# Altium PCB Driver_BLDC.PcbDoc (part 3 of 4)
Units mm, origin at the board's own origin, x right, y up, seen from the top; angles counter-clockwise.
Board outline 320 x 180.01 mm, 2 copper layers (Top Layer, Bottom Layer), stack 1.371 mm thick; 421 components, 171 nets, 1112 pads, 449 vias.
Unrouted connection lines stored in the file: 1.
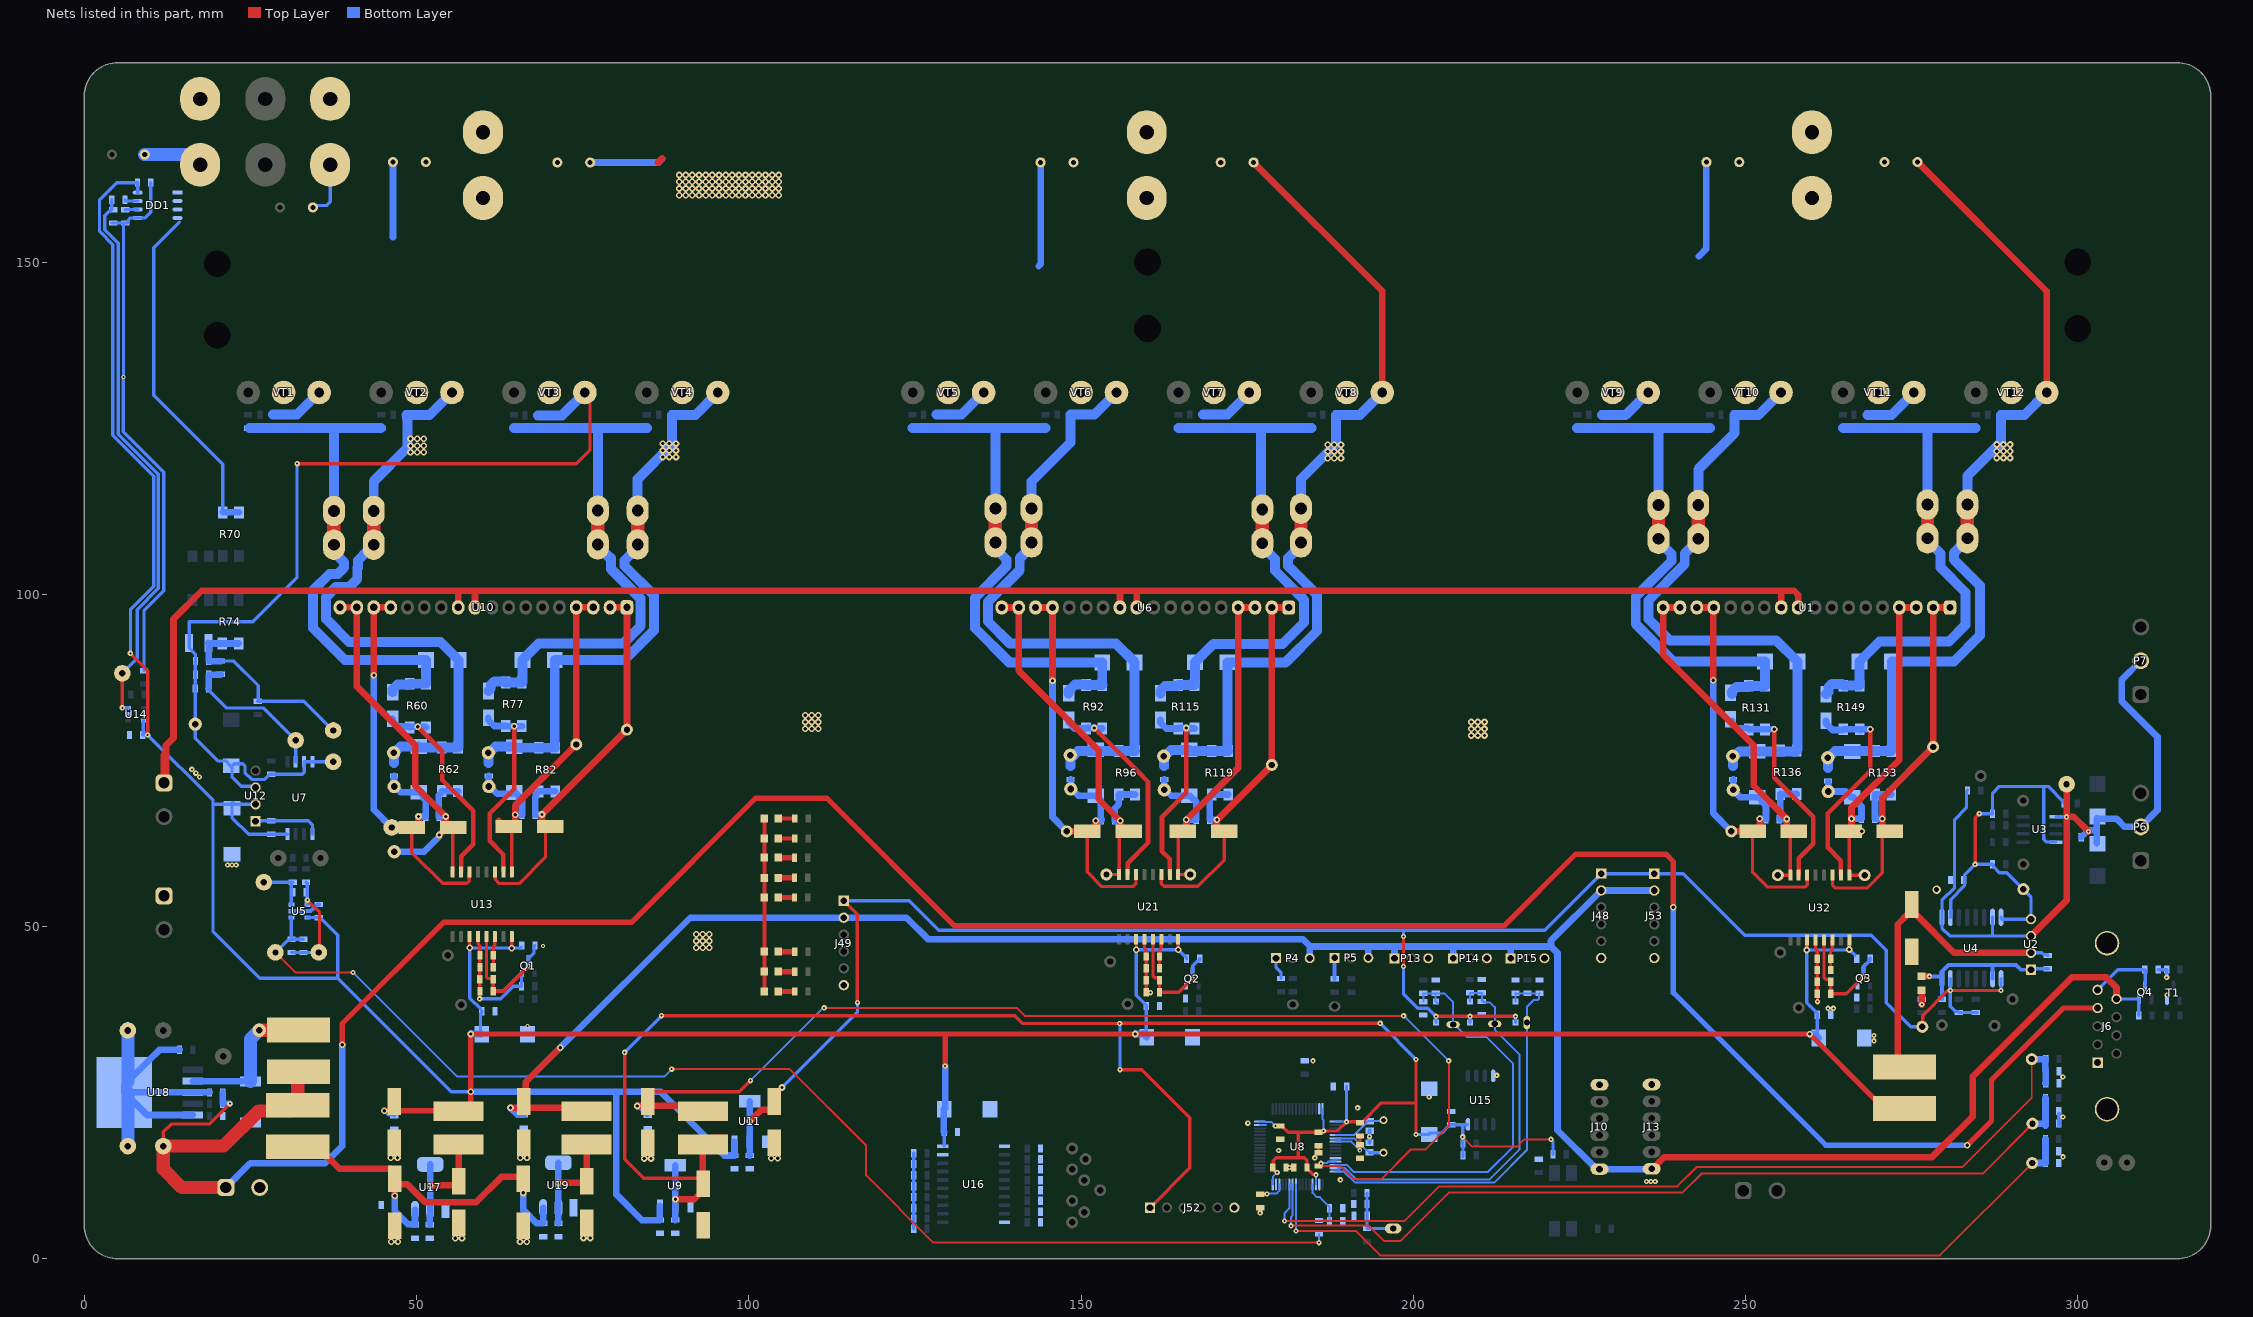
[diagram p2: the nets of this part, all layers, seen from the top]

## Via types
v1: diameter 1, hole 0.5, Top Layer to Bottom Layer, 222 vias
v2: diameter 0.8, hole 0.3, Top Layer to Bottom Layer, 162 vias
v3: diameter 0.8, hole 0.3, Top Layer to Bottom Layer, tented both sides, 29 vias
v4: diameter 1, hole 0.5, Top Layer to Bottom Layer, tented both sides, 21 vias
v5: diameter 1.27, hole 0.711, Top Layer to Bottom Layer, 5 vias
v6: diameter 9, hole 4, Top Layer to Bottom Layer, 4 vias
v7: diameter 0.6, hole 0.3, Top Layer to Bottom Layer, 3 vias
v8: diameter 2, hole 1, Top Layer to Bottom Layer, 1 vias
v9: diameter 0.7, hole 0.3, Top Layer to Bottom Layer, tented both sides, 1 vias
v10: diameter 1, hole 0.54, Top Layer to Bottom Layer, 1 vias

## Nets (pads, with @x,y where several pads share a name; then routed paths per layer and width w, separated by ;. In a path a pad name is that pad's centre, name@x,y a point inside that pad or via, vN(x,y) a via of type N, cw(c..) or ccw(c..) an arc to the next point about the centre after c; other vN are vias at no path point)
+3V3: C35.2 C37.1 D11.1 D13.1 D15.1 J48.1 J49.1 J53.1 R25.2 R28.2 TP6.1 U4.1 U4.7 U11.2 | length 288.1
  Top Layer w0.5: C37.1@103.85,23.85 103.85,24.675 104.944,25.769 v1(104.993,25.769) ; J49.1@114.3,53.87 116.325,51.845 116.325,38.575 v2(116.35,38.55) ; v2(198.525,43.975) 198.525,48.487 v2(198.538,48.5) ; v2(203.407,36.49) v2(208.532,36.49) ; v2(208.532,36.49) v2(215.375,36.49) ; TP6.1@276.033,34.9 276.033,35.441 276.279,35.441 276.662,35.824 276.662,36.607 280.365,40.311 280.768,40.311 v3(280.826,40.368) v3(288.446,40.368)
  Top Layer w1: v1(100.15,20.675) 101.9,22.425 103.35,22.425 103.85,22.925 C37.1@103.85,23.85
  Bottom Layer w0.5: v1(104.993,25.769) 116.35,37.126 v2(116.35,38.55) ; J49.1@114.3,53.87 124.18,53.87 128.589,49.461 198.538,49.461 ; v2(198.525,43.975) 198.525,39.875 200.7,37.7 202.197,37.7 v2(203.407,36.49) D13.1@203.407,35.55 ; v2(198.538,48.5) 198.538,49.461 ; D11.1@208.532,35.55 v2(208.532,36.49) ; D15.1@215.375,35.55 v2(215.375,36.49) ; TP6.1@276.609,34.9 274.849,34.9 271.2,38.549 271.2,46.434 268.934,48.7 249.85,48.7 240.59,57.96 J53.1@236.279,57.96 228.289,57.96 J48.1@228.279,57.97 219.77,49.461 198.538,49.461 ; U4.7@280.826,42.143 v3(280.826,40.368) 280.826,37.986 281.584,37.228 281.945,37.228 R25.2@282.095,37.078 R28.2@284.635,37.078 R28.2@284.86,37.078 ; v3(288.446,40.368) U4.1@288.446,42.143
  Bottom Layer w1: C35.2@100.15,15.55 U11.2@100.15,17.625 v1(100.15,20.675) U11.2@100.15,23.725
+3V3_MCU: C4.2 C5.1 C12.1 C13.1 C14.1 C15.1 C16.1 C43.1 C46.2 J52.1 L6.1 R13.1 R14.1 R58.2 R126.1 U8.1 U8.19 U8.32 U8.48 U8.64 U9.2 U15.8 | length 307
  Top Layer w0.3: C13.1@184.007,13.517 C13.1@184.007,13.742 ; v2(207.425,18.35) 208.9,16.875 215.627,16.875 216.727,17.975 v2(220.725,17.975)
  Top Layer w0.5: v2(81.31,31.079) 81.31,15.015 84.2,12.125 92.375,12.125 93.125,11.375 C43.1@93.125,11.3 ; v2(86.867,36.579) 140.021,36.579 141.2,35.4 v2(155.825,35.4) 155.85,35.425 v2(195.025,35.425) ; L6.1@93.125,17.2 94.375,18.45 L6.1@96.65,18.45 ; v2(155.875,28.45) 159.157,28.45 166.384,21.224 166.384,13.704 J52.1@160.38,7.7 ; C15.1@178.926,13.817 178.926,14.752 179.377,15.203 182.669,15.203 ; C15.1@179.001,13.592 179.001,13.367 179.331,13.037 179.45,13.037 v3(179.507,12.98) ; v3(179.238,19.975) 180.225,19.975 181.179,19.021 182.669,19.021 ; C13.1@184.001,13.781 184.001,14.825 183.623,15.203 182.669,15.203 ; C13.1@184.007,13.517 184.835,12.689 185.294,12.689 v2(185.351,12.631) ; C14.1@186.19,19.171 185.891,19.171 C14.1@185.741,19.021 182.669,19.021 ; v3(186.502,19.238) 188.587,19.238 v3(189.958,20.608) 189.981,20.631 191.314,20.631 191.317,20.629 R58.2@191.982,20.629 ; R58.2@191.982,20.479 192.132,20.629 192.381,20.629 195.198,23.446 200.4,23.446 ; v2(200.4,18.7) 200.4,23.446 ; v2(200.4,30) 200.4,23.446 ; 182.669,15.203 182.669,19.021
  Top Layer w1: v1(88.975,8.96) 91.785,8.96 93.125,10.3 C43.1@93.125,11.3 ; C43.1@93.075,12.975 L6.1@93.075,17.2
  Bottom Layer w0.3: U8.48@176.91,20.631 177.651,20.631 177.665,20.618 178.595,20.618 v3(179.238,19.975) ; U8.32@178.851,11.19 178.851,12.324 v3(179.507,12.98) ; U8.19@185.351,11.19 v2(185.351,12.631) ; U8.64@186.351,22.573 186.351,20.975 186.503,20.823 v3(186.502,19.238) ; U8.1@188.294,20.631 188.297,20.634 189.933,20.634 v3(189.958,20.608)
  Bottom Layer w0.5: v2(81.31,31.079) 81.379,31.148 81.437,31.148 v2(86.867,36.579) ; v2(155.825,35.4) 155.853,35.372 155.853,28.472 v2(155.875,28.45) ; v3(189.958,20.608) C16.1@189.958,25.942 ; v2(195.025,35.425) v2@200.4,30.05 ; v2(200.4,18.7) C5.1@202.4,18.7 ; C5.1@202.4,18.921 204.25,18.921 205.35,20.02 205.35,20.025 205.5,20.175 C4.2@205.725,20.175 207.425,20.175 ; R13.1@207.425,17.4 v2(207.425,18.35) 207.425,20.175 ; R14.1@207.475,15.381 R14.1@207.475,15.574 R13.1@207.475,17.35 ; U15.8@208.17,20.175 207.425,20.175 ; v2(220.725,17.975) 220.75,17.975 221.015,17.71 R126.1@221.015,15.753
  Bottom Layer w1: C46.2@88.925,5.825 U9.2@88.925,14.05
+3V3_REF: C17.2 C44.1 C45.2 L6.2 U8.13 | length 178
  Top Layer w0.3: v2(111.342,37.779) 140.321,37.779 141.55,36.55 198.525,36.55 v2(198.55,36.575) ; C17.2@185.741,13.975 188.975,13.975 190.95,12 195.158,12 199.583,16.425 201.775,16.425 205.35,20 205.35,29.775 v2(205.325,29.8)
  Top Layer w0.5: C44.1@84.775,23 C44.1@84.8,23.025 ; C44.1@84.8,23.675 84.8,24.382 85.55,25.132 98.577,25.132 v2(100.245,26.8)
  Top Layer w1: v1(83.225,23) C44.1@84.775,23 ; C44.1@84.8,23.025 L6.2@93.125,23.025
  Bottom Layer w0.3: v2(100.245,26.8) 111.224,37.779 v2(111.342,37.779) ; v3(186.124,14.375) 186.139,14.39 186.953,14.39 187.195,14.631 U8.13@188.292,14.631 ; v2(198.55,36.575) v2@205.311,29.814
  Bottom Layer w0.5: v1(83.225,23) 84.425,21.8 84.425,21.725 84.575,21.575 C45.2@84.8,21.575
+5: C6.2 C7.1 C19.1 C20.2 C21.1 C22.2 C23.1 C24.2 C25.2 C30.1 C36.2 C38.1 C40.2 C42.2 C51.1 C52.2 C73.2 DD1.8 L3.1 L7.2 R76.1 R104.1 R132.1 U5.5 U7.8 U9.3 U11.3 U12.2 U13.3 U13.8 U14.5 U16.20 U21.3 U21.8 U32.3 U32.8 | length 623.9
  Top Layer w0.4: U13.3@57.981,48.476 57.981,46.811 v4(58.004,46.789) ; U21.3@158.278,48.086 158.286,48.078 158.286,46.525 v4(158.316,46.496) ; v4(259.221,46.479) 259.246,46.505 259.246,47.954 U32.3@259.272,47.979
  Top Layer w0.5: v2(6.925,91.125) 9.548,88.502 v2(9.548,78.817) ; v4(64.329,46.739) 64.331,46.741 U13.8@64.331,48.476 ; v4(164.628,46.525) U21.8@164.628,48.086 ; v4(265.622,46.535) U32.8@265.622,47.979
  Top Layer w0.8: v1(45.15,22.3) 56.225,22.3 56.3,22.225 57.15,22.225 58.15,23.225 v1(58.15,25.139) v1(58.15,33.825) 58.157,33.818 129.55,33.818 ; v2(129.55,29.025) 129.55,33.818 ; L3.1@273.925,22.6 272.55,23.975 269.5,23.975 v1(259.657,33.818) 158.182,33.818 v1(158.175,33.825) 158.168,33.818 129.55,33.818
  Bottom Layer w0.5: v2(6.925,91.125) 6.95,91.15 6.95,97.675 10.45,101.175 10.45,117.75 4.3,123.9 4.3,152.6 2.3,154.6 2.3,159.375 4.872,161.947 7.97,161.947 C73.2@8.002,161.979 8.034,161.947 DD1.8@8.034,160.45 ; C40.2@8.748,78.817 8.873,78.942 8.873,80.925 8.948,81 U14.5@8.998,81 ; C40.2@8.945,78.963 8.945,78.82 8.948,78.817 v2(9.548,78.817) 19.375,68.99 19.375,68.385 ; U12.2@25.775,68.385 22.665,68.385 22.375,68.675 22.225,68.675 C30.1@22.225,68.385 ; U7.8@30.545,63.9 C38.1@28.15,63.9 24.725,63.9 22.225,66.4 C30.1@22.225,68.385 ; U5.5@33.517,51.375 33.534,51.358 35.497,51.358 35.497,51.345 35.668,51.175 35.681,51.175 38.157,48.698 38.157,42.211 ; v1(45.15,22.3) 45.775,21.675 46.511,21.675 C52.2@46.661,21.525 ; v1(58.15,25.139) 55.229,25.139 38.157,42.211 ; C24.2@59.628,37.611 58.004,39.235 v4(58.004,46.789) 58.014,46.778 64.289,46.778 v4(64.329,46.739) 64.36,46.77 65.634,46.77 65.776,46.912 R76.1@65.776,46.931 ; C19.1@59.796,33.818 59.789,33.825 59.628,33.985 59.628,36.86 59.796,37.028 C24.2@59.796,37.253 ; U16.20@129.421,16.967 C6.2@129.421,19.077 ; C21.1@159.813,33.9 159.813,36.673 159.813,38.144 158.316,39.641 v4(158.316,46.496) 158.345,46.525 v4(164.628,46.525) 165.635,45.517 165.712,45.517 165.862,45.367 R104.1@165.862,45.142 ; C23.1@260.812,33.8 C22.2@260.812,36.734 260.812,36.959 259.221,38.551 v4(259.221,46.479) 265.566,46.479 v4(265.622,46.535) R132.1@266.482,45.676 ; 19.375,68.385 C30.1@22.225,68.385 ; 19.375,68.385 19.375,49.225 26.389,42.211 38.157,42.211
  Bottom Layer w1: v1(58.15,25.139) 80.075,25.139 ; v1(58.15,33.825) C19.1@59.789,33.825 ; U9.3@86.625,7.95 C42.2@86.625,5.825 83.9,5.825 80.075,9.65 80.075,25.139 ; U11.3@97.85,17.625 C36.2@97.85,15.55 96.3,15.55 86.711,25.139 80.075,25.139 ; C7.1@129.346,22.5 129.346,19.152 C6.2@129.421,19.077 ; C7.1@129.4,22.5 129.55,22.65 v2(129.55,29.025) ; v1(158.175,33.825) 159.275,33.825 159.325,33.875 159.325,33.9 C21.1@159.875,33.35 ; v1(259.657,33.818) 260.405,33.818 C23.1@260.989,33.233
+5V_1: C66.2 C68.1 J6.9 J10.6 J13.6 J48.2 J49.2 J53.2 L4.2 P4.3 P5.3 P13.1 P14.1 P15.1 Q4.2 R48.1 | length 350.9
  Top Layer w1: v1(64.15,22.708) 65.65,22.708 66.15,23.208 66.65,22.708 L4.2@75.575,22.708 ; C68.1@66.15,23.675 66.423,23.948 66.423,26.573 v1(71.625,31.775) ; J13.6@235.865,13.525 236.137,13.525 236.715,14.103 236.715,14.241 237.774,15.3 278.075,15.3 284.195,21.42 284.195,27.445 299.128,42.378 304.249,42.378 305.825,40.802 J6.9@305.825,39.105
  Bottom Layer w0.5: J6.9@305.825,39.105 305.83,39.1 Q4.2@309.199,39.1 R48.1@309.199,36.625
  Bottom Layer w1: v1(64.15,22.708) 65.177,21.681 C66.2@66.15,21.681 ; v1(71.625,31.775) 91.18,51.33 123.72,51.33 126.95,48.1 183.375,48.1 184.411,47.064 ; P4.3@184.411,45.237 184.411,46.995 ; 184.48,46.995 193.101,46.995 ; P5.3@193.241,45.287 193.241,46.855 193.101,46.995 ; P13.1@197.177,45.225 197.177,46.995 ; P14.1@205.992,45.225 205.992,46.995 ; P15.1@214.662,45.225 214.662,46.995 ; J48.2@228.279,55.43 220.73,47.881 220.73,46.995 ; J48.2@228.289,55.42 J53.2@236.279,55.42 ; J13.6@236.475,13.5 227.547,13.5 221.7,19.347 221.7,46.025 220.73,46.995 ; 193.101,46.995 197.177,46.995 ; 197.177,46.995 205.992,46.995 ; 205.992,46.995 214.662,46.995 ; 214.662,46.995 220.73,46.995
+5V_HALL: J6.5 Q4.3 R54.2 | length 10.8
  Bottom Layer w0.5: J6.5@302.985,40.475 306.031,43.521 R54.2@310.099,43.521 ; Q4.3@310.149,41.05 R54.2@310.149,43.471
+5V_ISO: C9.2 R24.2 R26.2 R27.2 TP5.1 U2.4 U3.8 U4.10 U4.16 | length 63.4
  Top Layer w0.5: v3(284.558,59.367) 284.558,66.364 v3(285.176,66.982)
  Bottom Layer w0.5: U4.10@280.826,51.393 280.864,51.431 280.864,54.056 282.946,56.138 282.946,57.755 v3(284.558,59.367) 287.026,59.367 287.031,59.362 R27.2@287.171,59.362 ; v3@285.176,66.982 R26.2@287.176,66.982 287.176,70.081 288.176,71.081 294.902,71.081 ; R27.2@287.176,59.367 287.326,59.217 287.326,58.967 288.176,58.117 289.322,58.117 TP5.1@291.806,55.633 291.806,55.529 292.961,54.374 U2.4@292.961,51.118 288.538,51.118 288.446,51.21 U4.16@288.446,51.393 ; U3.8@296.711,62.712 295.311,62.712 294.902,63.121 294.902,71.081 ; R24.2@297.916,68.507 297.916,68.732 295.567,71.081 294.902,71.081
+5V_RS: C33.1 C34.2 L3.2 U2.2 | length 50.3
  Top Layer w1: L3.2@271.05,28.85 L3.2@273.925,28.85 ; L3.2@272.898,29.883 272.898,50.346 274.372,51.819 274.5,51.819 275,52.319 C33.1@275,53.319 ; C33.1@275,51.819 275.633,51.819 281.415,46.038 U2.2@292.961,46.038
  Bottom Layer w0.5: U2.2@292.961,46.038 294.598,46.038 294.838,45.798 295.333,45.798 C34.2@295.483,45.648
+8VDC: C49.1 C54.2 C60.2 C63.1 C72.2 L2.2 U17.3 U19.3 | length 61.1
  Top Layer w1: L2.2@32.125,16.861 33.5,15.486 36.464,15.486 38.4,13.55 46.2,13.55 C49.1@46.857,12.893 ; v1(46.7,9.5) C49.1@46.7,11 ; C49.1@47,11.2 47,11.75 C49.1@46.7,12.05 46.7,11.706 47.2,11.206 48.614,11.206 51.291,8.529 58.979,8.529 62.775,12.325 65.933,12.325 66.075,12.183 v10(66.075,9.91)
  Bottom Layer w1: v1(46.7,9.5) 46.7,7.204 48.704,5.2 49.671,5.2 C54.2@49.771,5.1 U17.3@49.77,7.405 ; v10(66.075,9.91) 66.075,7.346 68.088,5.333 C72.2@69.06,5.333 69.06,7.662 U19.3@69.056,7.667
+24V_1: C57.2 C58.1 R62.2 TP36.1 U10.17 U10.18 U13.16 | length 66.6
  Top Layer w0.5: U13.16@55.441,58.226 55.441,64.851 C58.1@55.501,64.911
  Top Layer w1: U10.18@38.481,98.029 U10.17@41.021,98.029 41.021,86.111 49.809,77.323 49.809,71.168 v4(54.406,66.571) 54.406,65.411 C58.1@54.906,64.911 ; v4(53.416,63.774) 54.001,64.36 54.001,64.411 54.501,64.911 C58.1@54.906,64.911 ; C58.1@55.501,64.911 C58.1@54.906,64.911
  Bottom Layer w1: TP36.1@46.252,61.25 51.118,61.25 53.416,63.547 v4(53.416,63.774) ; v4(54.406,66.571) 53.407,66.571 C57.2@53.366,66.531 53.366,69.77 53.791,70.195 R62.2@53.791,70.37 R62.2@56.241,70.37
+24V_2: C70.2 C71.1 R82.2 TP48.1 U10.1 U10.2 U13.11 | length 65.4
  Top Layer w0.5: U13.11@61.791,58.226 61.841,58.176 61.841,57.086 62.452,56.475 65.425,56.475 69.394,60.444 69.394,64.354 C71.1@69.739,64.698
  Top Layer w1: C71.1@69.739,64.698 C71.1@70.101,65.061 ; C71.1@69.739,65.061 69.376,65.061 C71.1@68.876,65.561 ; C71.1@70.125,65.084 C71.1@70.137,65.073 ; U10.2@79.121,98.029 U10.1@81.661,98.029 TP48.1@81.661,79.635 v4(68.876,66.851) ; C71.1@68.876,65.561 v4(68.876,66.851) ; C71.1@68.876,65.561 v4(68.876,66.851)
  Bottom Layer w1: v4(68.876,66.851) 67.917,66.851 C70.2@67.876,66.811 67.876,69.413 67.926,69.463 67.926,69.881 R82.2@68.401,70.356 R82.2@70.851,70.356
+24V_3: C86.2 C88.1 R96.2 TP50.1 U6.17 U6.18 U21.16 | length 59.5
  Top Layer w0.5: TP50.1@153.823,57.836 U21.16@155.738,57.836 155.738,63.511 C88.1@156.488,64.261 ; C88.1@155.893,65.071 156.643,64.321 C88.1@157.156,64.321
  Top Layer w1: U6.18@138.074,98.01 U6.17@140.614,98.01 140.614,88.555 152.664,76.505 152.664,69.16 v4(155.893,65.931) C88.1@155.893,65.071
  Bottom Layer w0.5: C86.2@155.073,65.95 C86.2@155.083,65.94 ; v4@155.883,65.94 v4(155.893,65.931)
  Bottom Layer w1: C86.2@155.073,65.95 155.073,67.78 155.678,68.385 R96.2@155.678,69.866 R96.2@158.128,69.866 ; C86.2@155.083,65.94 v4@155.883,65.94
+24V_4: C102.2 C104.1 R119.2 TP53.1 U6.1 U6.2 U21.11 | length 64.7
  Top Layer w0.5: U21.11@162.088,57.836 162.088,56.476 162.51,56.054 167.579,56.054 171.528,60.003 C104.1@171.528,64.331
  Top Layer w1: C104.1@171.528,64.331 170.948,64.331 170.448,64.831 v1(170.448,66.051) TP53.1@178.714,74.317 U6.2@178.714,98.01 U6.1@181.254,98.01
  Bottom Layer w1: C102.2@169.353,66.05 v1(170.448,66.051) ; C102.2@169.353,66.175 169.353,69.366 169.678,69.691 R119.2@169.678,69.866 R119.2@172.128,69.866
+24V_5: C115.2 C117.1 R136.2 TP56.1 U1.17 U1.18 U32.16 | length 60.5
  Top Layer w0.5: TP56.1@254.871,57.729 U32.16@256.732,57.729 256.732,63.804 C117.1@257.282,64.354
  Top Layer w1: U1.17@240.132,98.01 U1.18@237.592,98.01 237.592,90.891 251.231,77.252 251.231,71.2 256.187,66.244 256.187,64.854 256.687,64.354 C117.1@257.282,64.354
  Bottom Layer w1: C115.2@255.107,66.184 v4(256.187,66.184) ; C115.2@255.232,66.334 R136.2@255.232,69.939 R136.2@257.682,69.939
+24V_6: C138.2 C139.1 R153.2 TP58.1 U1.1 U1.2 U32.11 | length 64.6
  Top Layer w0.5: U32.11@263.082,57.729 263.082,56.254 263.536,55.8 268.279,55.8 270.564,58.085 270.564,63.604 270.991,64.031 271.388,64.031 C139.1@271.712,64.354
  Top Layer w1: C139.1@271.727,64.34 C139.1@271.712,64.354 271.064,64.354 270.564,64.854 v1(270.564,66.204) 270.564,69.364 TP58.1@278.232,77.032 U1.2@278.232,98.01 U1.1@280.772,98.01
  Bottom Layer w1: v1(270.564,66.204) 269.457,66.204 269.473,66.22 R153.2@269.473,69.879 R153.2@271.923,69.879
"+650 VDC": C78.2 C81.2 C84.2 DD1.3 DD1.4 R70.2 VT1.2 VT2.2 VT5.2 VT6.2 VT9.2 VT10.2 | length 93.7
  Bottom Layer w0.5: 14.321,156.021 10.475,152.175 10.475,129.925 20.825,119.575 R70.2@20.825,112.325
  Bottom Layer w1: R70.2@20.825,112.325 R70.2@23.275,112.325 ; 46.451,153.75 C78.2@46.451,165.054 ; 143.637,149.388 143.919,149.67 C81.2@143.919,165.004 ; 242.951,150.861 244.108,152.018 C84.2@244.108,165.034
+V_Servo: C55.1 C59.2 J6.4 L1.2 L2.1 P9.1 R67.2 | length 429.4
  Top Layer w0.5: C55.1@11.898,16.963 11.898,19.096 13.077,20.275 18.831,20.275 v2(21.894,23.338)
  Top Layer w0.8: v1(38.8,32.2) 38.8,35.375 54.05,50.625 82.325,50.625 101,69.3 111.775,69.3 130.975,50.1 213.65,50.1 224.45,60.9 238.025,60.9 239.129,59.796 v1(239.129,52.88) ; v1(283.35,17.1) 283.375,17.1 287.025,20.75 287.025,26.9 297.86,37.735 J6.4@302.985,37.735
  Top Layer w2: P9.1@21.31,10.725 14.7,10.725 11.898,13.527 C55.1@11.898,16.963 20.946,16.963 26.219,22.236 31.25,22.236 L2.1@32.125,23.111 L1.2@32.125,28.025
  Bottom Layer w0.8: v1(239.129,52.88) 239.129,40.046 262.075,17.1 v1(283.35,17.1)
  Bottom Layer w1: C59.2@20.848,25.04 R67.2@20.848,23.338 v2(21.894,23.338) ; P9.1@21.31,10.725 24.96,14.375 36.233,14.375 38.8,16.942 v1(38.8,32.2)
GND: C1.1 C2.1 C3.1 C4.1 C5.2 C6.1 C7.2 C8.2 C10.2 C12.2 C13.2 C14.2 C15.2 C16.2 C17.1 C18.1 C19.2 C20.1 C21.2 C22.1 C23.2 C24.1 C25.1 C28.1 C30.2 C33.2 C34.1 C35.1 C36.1 C37.2 C38.2 C40.1 C41.1 C42.1 C43.2 C44.2 C45.1 C46.1 C47.2 C48.1 C49.2 C50.2 C51.2 C52.1 C53.1 C54.1 C55.2 C56.1 C59.1 C60.1 C63.2 C64.1 C65.1 C66.1 C67.2 C68.2 C69.1 C72.1 C73.1 C74.1 C75.1 C87.1 C89.1 C90.1 C97.1 C98.1 C126.1 C127.1 D1.2 D2.2 D3.2 D4.2 D5.2 D6.2 D7.2 D8.2 D9.2 D10.2 DD1.5 J6.1 J6.MH1 J6.MH2 J10.1 J13.1 J48.6 J49.6 J52.6 J53.6 P4.1 P5.1 P8.1 P9.2 P10.1 P13.3 P14.3 P15.3 Q1.2 Q2.2 Q3.2 R4.2 R5.2 R6.2 R15.1 R16.1 R17.1 R18.1 R19.1 R20.1 R21.1 R29.1 R30.1 R31.1 R33.1 R34.1 R35.1 R37.1 R40.1 R42.1 R43.1 R44.1 R45.1 R52.2 R54.1 R56.2 R59.1 R65.1 R66.1 R68.1 R72.1 R73.1 R88.2 R107.1 R108.1 R113.2 R123.2 R124.2 R125.2 R128.2 R143.2 R146.1 R147.1 T1.2 U1.10 U1.11 U2.1 U4.2 U4.8 U5.2 U6.10 U6.11 U7.5 U8.12 U8.18 U8.31 U8.47 U8.63 U9.1 U10.10 U10.11 U11.1 U12.1 U13.4 U14.2 U15.4 U16.1 U16.10 U16.19 U17.1 U18.3 U18.5 U18.6 U19.1 U21.4 U32.4 | length 553.5
  Top Layer w0.5: U13.4@59.251,48.476 59.257,48.471 59.257,47.377 59.532,47.101 R73.1@59.532,42.062 59.532,40.282 59.523,40.273 59.523,39.133 v2(59.504,39.114) ; U21.4@159.548,48.086 159.548,46.711 159.813,46.446 C98.1@159.813,45.491 R107.1@159.813,43.721 C97.1@159.813,40.118 159.842,40.089 160.421,40.089 v2(160.45,40.061) ; C17.1@185.741,15.975 C14.2@185.741,17.021 ; U32.4@260.542,47.979 260.542,46.603 260.812,46.333 C127.1@260.812,45.175 ; C127.1@260.807,45.17 R146.1@260.807,43.45 R147.1@260.807,41.67 260.807,39.9 260.825,39.882 260.825,38.701 v2(260.837,38.688)
  Top Layer w0.6: D9.2@102.33,66.255 D7.2@102.33,63.245 102.33,60.366 102.33,57.366 102.33,54.366 D6.2@102.33,46.216 102.33,43.216 102.33,40.241 102.355,40.216 D4.2@102.414,40.157
  Top Layer w1: 12,75.825 P8.1@12,71.619 12.301,71.92 12.301,75.825 12.301,77.241 13.425,78.365 13.425,96.275 17.675,100.525 56.317,100.525 ; U10.11@56.261,98.029 56.261,100.469 56.317,100.525 ; U10.10@58.801,98.029 58.801,100.205 59.121,100.525 ; U6.11@155.854,98.01 155.854,100.525 ; U6.10@158.554,98.17 U6.10@158.394,98.01 158.394,100.205 158.714,100.525 ; U1.11@255.372,98.01 255.372,100.516 255.38,100.525 ; U1.10@257.912,98.01 257.912,99.939 257.326,100.525 255.38,100.525 ; D8.2@276.541,42.468 276.581,42.508 v3(277.651,42.508) ; 56.317,100.525 59.121,100.525 ; 59.121,100.525 155.854,100.525 ; 155.854,100.525 158.714,100.525 ; 158.714,100.525 255.38,100.525
  Bottom Layer w0.3: U8.47@176.912,20.129 177.804,20.129
  Bottom Layer w0.5: C74.1@4.129,155.874 C74.1@4.354,155.874 5.9,155.874 C75.1@6.183,155.874 ; C75.1@6.05,155.874 5.9,155.724 5.9,132.752 5.875,132.727 5.875,124.425 11.95,118.35 11.95,100.525 8.975,97.55 R66.1@8.975,88.512 ; C75.1@6.408,155.874 6.558,156.024 6.558,156.249 6.949,156.64 DD1.5@8.034,156.64 9.143,156.64 10.002,157.499 C73.1@10.002,161.979 ; U12.1@25.719,65.789 U12.1@25.775,65.845 25.83,65.9 C38.2@28.15,65.9 33.705,65.9 34.355,65.25 U7.5@34.355,63.9 ; v2(59.504,39.114) 62.682,39.114 64.572,41.004 R88.2@65.784,41.004 65.784,42.379 65.834,42.429 65.834,42.864 Q1.2@65.884,42.914 ; R33.1@124.82,4.522 R34.1@124.82,6.077 R35.1@124.82,7.622 R37.1@124.82,9.292 R42.1@124.82,10.932 R43.1@124.82,12.577 R44.1@124.82,14.267 R45.1@124.82,15.886 ; P4.1@179.331,45.237 179.331,43.894 180.081,43.144 R29.1@180.081,42.193 ; R54.1@312.099,43.521 R56.2@313.374,43.521 v2(313.374,42.354)
  Bottom Layer w0.6: U5.2@31.165,52.325 34.069,52.325 34.495,52.751 34.495,52.752 35.068,53.325 C25.1@35.293,53.325 ; R30.1@188.161,42.127 P5.1@188.161,45.287 ; C10.2@193.414,17.469 v3(193.414,18.386) C8.2@193.414,19.304 ; v3(277.651,42.508) 279.509,42.508 279.556,42.462 U4.8@279.556,42.143 ; R40.1@279.555,39.078 U4.8@279.556,42.143 ; U4.2@287.176,42.143 287.176,44.238 ; C34.1@295.483,43.648 293.111,43.648 U2.1@292.961,43.498 291.451,43.498 290.711,44.238 287.176,44.238 ; C2.1@297.15,20.034 R5.2@297.15,21.822 ; U4.8@279.556,42.143 279.575,42.162 279.575,43.237 280.575,44.238 287.176,44.238
  Bottom Layer w1: U18.6@6.03,25.04 6.03,26.17 6.564,26.704 6.564,26.713 9.72,29.87 9.73,29.87 11.3,31.44 C56.1@14.327,31.44 ; U18.6@6.564,24.506 9.434,21.636 U18.5@16.335,21.636 ; U18.6@6.564,25.04 U18.3@16.335,25.04 ; U18.3@16.335,25.04 C59.1@18.848,25.04
  Bottom Layer w2: C55.2@6.386,16.963 6.386,17.098 6.564,17.276 6.564,24.506 U18.6@6.564,25.04 ; U18.6@6.564,26.713 C47.2@6.564,34.362
  other v1: 46.198,2.584 47.198,2.584 65.573,2.584 66.573,2.584 55.848,3.109 56.848,3.109 75.123,3.134 76.123,3.134 84.273,15.084 85.273,15.084 103.373,15.134 104.373,15.134 46.134,15.189 47.134,15.189 65.623,15.209 66.623,15.209 92.072,46.82 93.072,46.82 94.072,46.82 92.072,47.816 93.072,47.816 94.072,47.816 92.072,48.852 93.072,48.852 94.072,48.852 208.722,78.745 209.722,78.745 210.722,78.745 208.722,79.741 209.722,79.741 210.722,79.741 108.475,79.779 109.475,79.779 110.475,79.779 108.475,80.775 109.475,80.775 110.475,80.775 208.722,80.777 209.722,80.777 210.722,80.777 108.475,81.811 109.475,81.811 110.475,81.811
  other v2: 235.099,11.63 235.75,11.63 236.4,11.63 297.783,15.338 179.741,16.288 175.1,20.4 297.758,21.338 191.634,22.717 202.395,24.357 297.758,27.363 212.561,27.607 184.9,29.8 269.325,32.8 269.324,33.6 262.412,37.683 263.212,37.683 313.424,39.677 21.566,59.264 22.216,59.275 22.866,59.275 17.343,72.509 16.793,73.091 16.191,73.649
  other v3: 176.95,6.925 189.03,11.881 181.375,13.742 185.195,15.203
  other v7: 66.705,35.068 69,47.075 5.875,132.7
"GND -650VDC": C11.1 C31.1 C32.2 C39.1 C76.1 C77.1 C79.1 C82.2 C83.1 C85.1 C110.1 C112.2 C142.1 C143.2 J2.1 J21.1 J31.1 J40.1 R79.1 R80.1 R81.1 R82.1 R91.1 R93.1 R102.1 R103.1 R116.1 R117.1 R118.1 R119.1 R152.1 R153.1 TP30.1 TP69.1 U7.3 U7.4 U12.3 VD6.1 VD8.1 VD15.1 VD17.1 VD25.1 VD27.1 VT3.3 VT4.3 VT7.3 VT8.3 VT11.3 VT12.3 | length 545.4
  Top Layer w0.5: v2(32.025,119.65) 74.05,119.65 76.093,121.693 76.093,128.784 75.334,129.543 VT3.3@75.334,130.369
  Top Layer w1: 86.335,164.983 86.919,165.567 86.995,165.567 ; C83.1@175.971,165.004 195.334,145.641 VT8.3@195.334,130.369 ; C85.1@275.869,165.059 295.334,145.595 VT12.3@295.334,130.369
  Top Layer w2: J21.1@83.277,107.512 J21.1@83.277,112.592 ; J31.1@183.094,107.808 J31.1@183.094,112.888 ; J40.1@283.38,108.426 J40.1@283.38,113.506
  Bottom Layer w0.5: U12.3@25.775,70.925 25.574,71.126 23.614,71.126 22.222,72.518 22.222,73.978 C32.2@22.125,74.075 ; v2(32.025,119.65) 32,119.625 32,102.5 25.375,95.875 15.774,95.875 R80.1@15.774,92.675 15.774,91.924 16.725,90.974 C77.1@16.725,89.975 16.7,89.95 16.7,87.913 R79.1@16.7,85.825 16.7,78.325 20.1,74.925 21.275,74.925 C32.2@22.125,74.075 ; C79.1@34.3,158.5 36.399,158.5 37,159.101 J2.1@37,164.634 ; TP30.1@37.446,74.8 U7.4@34.355,74.8 U7.3@33.085,74.8 33.085,73.193 32.792,72.9 C31.1@28.125,72.9 27.9,72.9 27.132,72.132 25.183,72.132 24.175,73.14 24.175,74.207 23.882,74.5 22.55,74.5 C32.2@22.125,74.075
  Bottom Layer w1: C11.1@76.135,164.983 86.411,164.983 86.995,165.567
  Bottom Layer w1.5: C82.2@60.857,74.645 60.831,74.67 60.831,76.12 VD8.1@60.806,76.145 60.956,76.145 61.892,77.081 C39.1@64.686,77.081 64.861,76.906 R82.1@68.401,76.906 R82.1@70.851,76.906 70.797,76.96 VD6.1@70.797,90.131 81.281,90.131 85.7,94.549 85.7,99.875 R81.1@81.299,104.276 81.299,105.098 83.277,107.075 J21.1@83.277,112.592 83.277,117.36 88.439,122.522 R91.1@88.439,127.004 91.969,127.004 VT4.3@95.334,130.369 ; R93.1@68.31,126.934 71.899,126.934 VT3.3@75.334,130.369 ; C112.2@162.503,74.141 162.478,74.166 162.478,75.615 VD17.1@162.453,75.641 162.573,75.641 163.523,76.591 C110.1@166.273,76.591 166.448,76.416 R119.1@169.678,76.416 R119.1@172.128,76.416 R119.1@171.994,76.55 ; R103.1@168.361,127.061 172.026,127.061 VT7.3@175.334,130.369 ; R119.1@172.034,77.13 VD15.1@172.034,89.771 180.794,89.771 185.5,94.477 185.5,99.936 R118.1@181.179,104.257 181.179,105.461 183.094,107.376 J31.1@183.094,107.808 ; J31.1@183.25,107.964 183.25,112.732 J31.1@183.094,112.888 183.094,117.34 188.376,122.621 R102.1@188.376,127.01 191.976,127.01 VT8.3@195.334,130.369 ; C143.2@262.418,73.894 262.393,73.92 262.393,75.369 VD27.1@262.368,75.394 262.419,75.394 263.454,76.429 R153.1@269.473,76.429 R153.1@271.923,76.429 272.048,76.555 VD25.1@272.048,89.904 281.359,89.904 285.26,93.805 285.26,101.323 R152.1@281.34,105.243 281.34,106.204 283.38,108.244 J40.1@283.38,108.426 283.38,117.817 288.452,122.889 R117.1@288.452,127.004 291.969,127.004 VT12.3@295.334,130.369 ; R116.1@268.335,127.004 271.969,127.004 VT11.3@275.334,130.369
  other v1: 187.124,120.487 188.124,120.487 189.124,120.487 287.811,120.521 288.811,120.521 289.811,120.521 87.041,120.65 88.041,120.65 89.041,120.65 187.124,121.484 188.124,121.484 189.124,121.484 287.811,121.517 288.811,121.517 289.811,121.517 87.041,121.646 88.041,121.646 89.041,121.646 187.124,122.519 188.124,122.519 189.124,122.519 287.811,122.553 288.811,122.553 289.811,122.553 87.041,122.682 88.041,122.682 89.041,122.682 89.513,160.03 90.513,160.03 91.513,160.03 92.513,160.03 93.513,160.03 94.513,160.03 95.513,160.03 96.513,160.03 97.514,160.03 98.514,160.03 99.514,160.03 100.514,160.03 101.514,160.03 102.514,160.03 103.514,160.03 104.514,160.03 89.513,161.066 90.513,161.066 91.513,161.066 92.513,161.066 93.513,161.066 94.513,161.066 95.513,161.066 96.513,161.066 97.514,161.066 98.514,161.066 99.514,161.066 100.514,161.066 101.514,161.066 102.514,161.066 103.514,161.066 104.514,161.066 89.513,162.062 90.513,162.062 91.513,162.062 92.513,162.062 93.513,162.062 94.513,162.062 95.513,162.062 96.513,162.062 97.514,162.062 98.514,162.062 99.514,162.062 100.514,162.062 101.514,162.062 102.514,162.062 103.514,162.062 104.514,162.062 89.513,163.098 90.513,163.098 91.513,163.098 92.513,163.098 93.513,163.098 94.513,163.098 95.513,163.098 96.513,163.098 97.514,163.098 98.514,163.098 99.514,163.098 100.514,163.098 101.514,163.098 102.514,163.098 103.514,163.098 104.514,163.098
GND_2: C9.1 P6.2 P7.2 R38.1 R41.1 TP20.1 U2.3 U3.5 U4.9 U4.15 ZD1.2 ZD2.2 | length 112.7
  Top Layer w1: U2.3@292.961,48.578 298.316,53.933 v3(298.316,66.522) ; TP20.1@298.316,71.428 v3(298.316,66.522) ; v2(301.604,64.312) 299.394,66.522 v3(298.316,66.522) ; P6.2@309.475,65 P6.2@309.475,65.161
  Bottom Layer w0.5: R38.1@283.396,70.487 283.246,70.337 283.246,67.857 281.453,66.065 281.453,56.922 281.453,55.845 279.556,53.947 U4.9@279.556,51.393 279.556,49.769 280.747,48.578 287.176,48.578 ; U4.15@287.176,51.393 287.176,48.578 ; U2.3@292.961,48.578 287.176,48.578 ; U3.5@296.711,66.522 v3(298.316,66.522) ; ZD2.2@302.858,62.549 ZD2.2@302.946,62.462
  Bottom Layer w1: R41.1@300.516,63.437 300.516,63.462 300.716,63.662 300.741,63.662 v2@301.497,64.419 ; v2@301.604,64.477 302.858,64.477 ; ZD2.2@302.858,62.549 302.858,64.477 ; ZD1.2@302.858,66.287 302.858,64.477 ; ZD1.2@303.296,66.197 305.876,66.197 307.072,65 P6.2@309.475,65 312,67.525 312,78.543 306.6,83.943 306.6,87.125 P7.2@309.475,90
  other v5: 278.751,55.569
GND_-24V_1: C57.1 C58.2 C61.2 C62.1 TP44.1 U10.15 U10.16 U13.14 VD4.2 | length 68.6
  Top Layer w0.5: C58.2@49.278,64.911 49.278,61.129 53.908,56.5 57.581,56.5 57.931,56.851 57.931,58.176 U13.14@57.981,58.226
  Top Layer w1: v1(43.586,87.818) 43.561,87.843 U10.16@43.561,98.029 U10.15@46.101,98.029 ; TP44.1@46.654,64.889 49.256,64.889 C58.2@49.278,64.911 49.786,64.911 50.286,65.411 v4(50.286,66.561)
  Bottom Layer w1: v1(43.586,87.818) 43.586,67.576 TP44.1@46.252,64.911 ; C62.1@46.599,72.645 46.611,72.632 46.611,71.082 VD4.2@46.623,71.07 46.796,71.07 47.671,70.195 C61.2@50.321,70.195 50.471,70.195 51.071,69.595 51.071,69.304 51.366,69.009 C57.1@51.366,66.531 51.336,66.561 v4(50.286,66.561)
GND_-24V_2: C39.2 C70.1 C71.2 C82.1 TP49.1 U10.3 U10.4 U13.9 VD8.2 | length 59.4
  Top Layer w0.5: U13.9@64.331,58.226 C71.2@64.331,64.608
  Top Layer w1: C71.2@62.378,65.932 62.378,65.561 62.878,65.061 64.336,65.061 64.836,65.561 v4(64.836,66.811) 64.836,68.199 TP49.1@74.041,77.404 U10.4@74.041,98.029 U10.3@76.581,98.029 ; C71.2@64.331,64.608 C71.2@64.378,64.561
  Bottom Layer w1: C82.1@60.857,72.645 60.869,72.632 60.869,71.082 VD8.2@60.881,71.07 61.035,71.07 62.124,69.981 64.486,69.981 C39.2@64.686,70.181 64.836,70.181 65.436,69.581 65.436,69.431 65.876,68.991 C70.1@65.876,66.811 v4(64.836,66.811)
GND_-24V_3: C86.1 C88.2 C92.2 C94.1 TP52.1 U6.15 U6.16 U21.14 VD13.2 | length 68.4
  Top Layer w0.5: C88.2@150.893,64.361 C88.2@150.933,64.321 ; C88.2@152.193,65.071 151.443,64.321 C88.2@150.933,64.321 ; U21.14@158.278,57.836 158.278,56.508 157.796,56.025 153.125,56.025 150.933,58.217 C88.2@150.933,64.321
  Top Layer w1: U6.16@143.154,98.01 U6.15@145.694,98.01 v1(145.694,86.98) ; TP52.1@148.085,64.361 C88.2@150.893,64.361 ; C88.2@152.193,65.071 v4(152.193,65.931)
  Bottom Layer w0.5: v4(152.193,65.931) v4@152.203,65.94 ; C86.1@153.063,65.94 C86.1@153.073,65.95
  Bottom Layer w1: v1(145.694,86.98) 145.694,66.482 TP52.1@147.856,64.321 ; C94.1@148.427,72.14 148.44,72.128 148.44,70.717 VD13.2@148.452,70.705 ; VD13.2@148.731,70.566 149.606,69.691 C92.2@152.193,69.691 152.343,69.691 152.943,69.091 152.943,66.301 C86.1@153.073,66.171 ; v4@152.203,65.94 C86.1@153.063,65.94
GND_-24V_4: C102.1 C104.2 C110.2 C112.1 TP54.1 U6.3 U6.4 U21.9 VD17.2 | length 59.6
  Top Layer w0.5: C104.2@165.305,64.331 C104.2@165.875,64.9 ; C104.2@165.395,64.321 165.378,64.321 164.628,63.571 U21.9@164.628,57.836 TP54.1@166.439,57.836
  Top Layer w1: v1(165.835,66.05) 173.634,73.849 U6.4@173.634,98.01 U6.3@176.174,98.01 ; C104.2@165.875,64.9 v1@165.875,66
  Bottom Layer w1: C112.1@162.503,72.141 162.516,72.128 162.516,70.578 VD17.2@162.528,70.566 162.696,70.566 163.571,69.691 C110.2@166.273,69.691 166.423,69.691 167.353,68.761 C102.1@167.353,66.05 165.936,66.05 v1@165.926,66.04
GND_-24V_5: C115.1 C117.2 C122.2 C123.1 TP57.1 U1.15 U1.16 U32.14 VD23.2 | length 69.9
  Top Layer w0.5: C117.2@251.059,64.354 251.059,58.168 253.268,55.959 258.979,55.959 259.272,56.252 U32.14@259.272,57.729
  Top Layer w1: U1.16@242.672,98.01 U1.15@245.212,98.01 245.161,97.959 v1(245.161,87.081) ; TP57.1@248.446,64.329 251.034,64.329 C117.2@251.059,64.354 251.627,64.354 252.127,64.854 v4(252.127,66.204)
  Bottom Layer w1: v1(245.161,87.081) 245.161,67.025 TP57.1@247.86,64.326 ; C123.1@248.127,72.135 248.139,72.123 248.139,70.573 VD23.2@248.151,70.56 ; VD23.2@248.295,70.349 249.17,69.474 C122.2@251.787,69.474 ; C122.2@251.791,69.47 251.941,69.47 252.537,68.874 252.537,68.724 253.087,68.174 C115.1@253.087,66.164 253.047,66.204 v4(252.127,66.204)
GND_-24V_6: C138.1 C139.2 C142.2 C143.1 TP59.1 U1.3 U1.4 U32.9 VD27.2 | length 61.6
  Top Layer w0.5: C139.2@265.489,64.354 C139.2@265.938,64.803 ; C139.2@265.622,64.221 U32.9@265.622,57.729 TP59.1@267.927,57.729 TP59.1@268.125,57.729
  Top Layer w1: C139.2@265.622,64.221 C139.2@265.489,64.354 265.938,64.354 v1(267.489,64.354) ; C139.2@265.938,64.803 265.938,67.894 273.152,75.108 U1.4@273.152,98.01 U1.3@275.692,98.01
  Bottom Layer w0.5: C143.1@262.418,71.894 C143.1@262.431,71.882 ; VD27.2@262.431,70.332 VD27.2@262.443,70.319
  Bottom Layer w1: VD27.2@262.431,70.332 C143.1@262.431,71.882 ; VD27.2@262.443,70.319 265.063,70.319 265.938,69.444 C142.2@266.088,69.444 266.238,69.444 267.088,68.594 267.088,68.444 267.457,68.075 C138.1@267.457,66.204 265.954,66.204 v1(265.938,66.22)
NetC1_2: C1.2 R1.2 R4.1 TP1.1 U8.27 | length 137.9
  Top Layer w0.3: v2(180.621,5.7) 198.705,5.7 203.905,10.9 239.725,10.9 242.619,13.794 282.619,13.794 293.072,24.247 TP1.1@293.072,30.054
  Bottom Layer w0.3: v2(180.621,5.7) 180.621,6.868 181.351,7.598 U8.27@181.351,11.19
  Bottom Layer w1: TP1.1@292.704,30.054 TP1.1@293.072,30.054 R1.2@295.161,30.054 295.095,29.988 295.095,28.29 C1.2@295.161,28.224 R4.1@295.161,26.425 R4.1@295.15,26.414 ; R1.2@295.151,30.064 R1.2@295.161,30.054
NetC2_2: C2.2 R2.2 R5.1 TP2.1 U8.26 | length 132.7
  Top Layer w0.3: v2(181.6,4.97) 181.63,5 193.289,5 195.588,2.701 198.106,2.701 205.405,10 240.55,10 243.375,12.825 285.666,12.825 TP2.1@293.185,20.344
  Bottom Layer w0.3: v2(181.6,4.97) 181.6,6.274 181.851,6.525 U8.26@181.851,11.19
  Bottom Layer w1: TP2.1@292.757,20.344 TP2.1@293.185,20.344 295.146,20.344 C2.2@295.15,20.348 ; C2.2@295.15,20.034 C2.2@295.15,20.348 ; R2.2@295.15,24.189 C2.2@295.15,20.348
NetC3_2: C3.2 R3.2 R6.1 TP3.1 U8.25 | length 130.7
  Top Layer w0.3: v3(182.35,4.18) 182.37,4.2 191.327,4.2 195.002,0.525 279.25,0.525 TP3.1@293.135,14.41
  Bottom Layer w0.3: v3(182.35,4.18) 182.351,4.181 U8.25@182.351,11.19
  Bottom Layer w1: TP3.1@293.135,14.41 295.135,14.41 R6.1@295.15,14.425 C3.2@295.15,16.193 R3.2@295.15,18.025
NetC8_1: C8.1 U8.5 Y1.2 | length 8.2
  Bottom Layer w0.3: U8.5@188.294,18.631 191.135,18.631 193.262,20.759 195.401,20.759 Y1.2@195.524,20.881
NetC10_1: C10.1 U8.6 Y1.1 | length 8.1
  Bottom Layer w0.3: U8.6@188.294,18.131 191.127,18.131 192.915,16.343 193.085,16.343 193.414,16.014 C10.1@193.447,15.981
  Bottom Layer w0.5: C10.1@193.447,15.981 Y1.1@195.524,15.981
NetC11_2: C11.2 C61.1 C62.2 C78.1 J7.1 J16.1 R61.1 R62.1 R86.1 R87.1 VD2.1 VD4.1 VT1.3 VT2.3 VT3.2 VT4.2 | length 106
  Top Layer w2: J16.1@43.562,107.464 J16.1@43.562,112.544
  Bottom Layer w1.5: R87.1@28.432,127.036 32.001,127.036 VT1.3@35.334,130.369 ; R61.1@41.075,103.998 41.075,102.3 39.9,101.125 37.901,101.125 36.4,99.624 36.4,96.274 39.853,92.822 53.626,92.822 VD2.1@56.317,90.131 56.317,76.996 R62.1@56.241,76.92 R62.1@53.791,76.92 50.496,76.92 C61.1@50.321,77.095 47.596,77.095 46.646,76.145 VD4.1@46.548,76.145 46.573,76.12 46.573,74.67 C62.2@46.599,74.645 ; R61.1@41.183,103.998 41.183,105.084 42.487,106.388 42.499,106.388 43.562,107.452 J16.1@43.562,107.464 J16.1@43.562,112.544 43.562,117.012 48.641,122.091 48.641,126.402 48.598,126.445 48.598,126.904 R86.1@48.498,127.004 51.969,127.004 VT2.3@55.334,130.369
  other v1: 49.084,121.371 50.084,121.371 51.084,121.371 49.084,122.367 50.084,122.367 51.084,122.367 49.084,123.403 50.084,123.403 51.084,123.403
NetC18_2: C18.2 U8.30 | length 3.9
  Top Layer w0.3: C18.2@176.95,9.7 C18.2@176.973,9.723 ; v2@177.949,9.723 v2(177.972,9.746)
  Top Layer w0.5: C18.2@176.973,9.723 v2@177.949,9.723
  Bottom Layer w0.3: v2@178.172,9.796 179.416,9.796 179.849,10.229 179.849,11.188 U8.30@179.851,11.19
NetC27_1: C27.1 C29.1 R51.2 R53.1 TP25.1 U5.4 | length 17.2
  Top Layer w0.5: v3(33.565,53.975) 35.402,52.138 TP25.1@35.402,45.12
  Bottom Layer w0.5: C29.1@31.185,46.105 TP25.1@35.293,46.105 ; R51.2@33.375,56.675 33.415,56.675 33.565,56.525 v3(33.565,53.975) U5.4@33.565,53.275
NetC27_2: C27.2 R49.2 TP21.1 U5.3 | length 7.8
  Bottom Layer w0.5: TP21.1@27.025,56.685 27.035,56.675 R49.2@31.315,56.675 ; U5.3@31.165,53.275 31.165,56.525 R49.2@31.315,56.675 ; R49.2@31.365,56.675 R49.2@31.315,56.675
NetC28_2: C28.2 R50.1 R52.1 U8.20 | length 8.4
  Bottom Layer w0.3: U8.20@184.851,11.19 184.853,11.188 184.853,9.91 185.493,9.271 185.939,9.271 187.385,7.825 R52.1@187.385,7.6 ; R50.1@185.8,5.75 187.336,5.75 C28.2@187.386,5.7 R52.1@187.385,7.6
NetC29_2: C29.2 R50.2 R53.2 TP23.1 U5.1 | length 188.4
  Top Layer w0.3: TP23.1@28.765,46.105 31.82,43.05 40.425,43.05 v2(40.45,43.075) ; v2(88.396,28.539) 106.161,28.539 117.65,17.05 117.65,12.566 127.791,2.425 v2(185.8,2.425)
  Bottom Layer w0.3: v2(40.45,43.075) 56.125,27.4 87.257,27.4 v2(88.396,28.539) ; v2(185.8,2.425) R50.2@185.8,3.75
  Bottom Layer w0.5: TP23.1@28.765,46.105 30.615,47.955 31.035,47.955 C29.2@31.185,48.105 ; U5.1@31.165,51.375 31.165,48.125 C29.2@31.185,48.105 ; R53.2@32.995,48.105 C29.2@31.185,48.105
NetC41_2: C41.2 R57.2 R63.1 R65.2 TP34.1 | length 9.8
  Bottom Layer w0.5: R63.1@193.025,9.896 193.04,9.881 R57.2@193.04,4.55 TP34.1@197.475,4.55
NetC48_2: C48.2 R58.1 U8.7 | length 6.3
  Top Layer w0.5: v9(191.964,16.332) 191.973,16.341 191.973,17.275 191.982,17.284 R58.1@191.982,18.436
  Bottom Layer w0.3: U8.7@188.294,17.631 190.665,17.631 v9(191.964,16.332)
NetC50_1: C50.1 C53.2 L7.1 U17.2 | length 19.3
  Top Layer w1: v1(52.06,11.05) 55.85,11.05 56.35,11.55 56.35,11.6 56.35,17.175 L7.1@56.3,17.225
  Bottom Layer w1: C53.2@52.011,5.1 52.011,6.601 52.06,6.651 U17.2@52.06,7.405 v1(52.06,11.05) U17.2@52.06,14.195
NetC64_2: C64.2 Q1.3 R73.2 R76.2 U13.5 | length 19.5
  Top Layer w0.5: U13.5@60.521,48.476 60.521,42.446 60.796,42.171 61.423,42.171 R73.2@61.532,42.062 ; C64.2@61.542,40.272 C64.2@61.542,40.282
  Top Layer w0.6: R73.2@61.532,42.062 61.532,41.737 61.532,40.282 61.542,40.282 63.052,40.282 v3(66.834,44.064)
  Bottom Layer w0.5: v3(66.834,44.064) Q1.3@66.834,45.214 66.884,45.264 66.884,45.489 67.109,45.489 67.684,46.064 67.684,47 R76.2@67.834,47.15
NetC65_2: C65.2 R72.2 U13.6 | length 4.7
  Top Layer w0.5: R72.2@61.542,43.851 61.586,43.896 61.586,47.051 61.791,47.256 U13.6@61.791,48.476
NetC67_1: C67.1 C69.2 L4.1 U19.2 | length 19.7
  Top Layer w1: v1(71.35,11.433) 75.625,11.433 75.625,17.658 L4.1@75.575,17.708
  Bottom Layer w1: C69.2@71.35,5.333 U19.2@71.35,14.453
NetC74_2: C74.2 R69.2 TP62.1 U14.3 | length 83.5
  Top Layer w0.5: v2(5.724,82.922) TP62.1@5.724,88.112
  Bottom Layer w0.5: R69.2@4.116,159.392 4.125,159.383 4.125,158.024 4.078,157.976 4.078,157.823 3.979,157.724 3.825,157.724 3.075,156.973 3.075,154.875 5.125,152.825 5.125,124.1 11.15,118.075 11.15,100.875 7.975,97.7 7.975,90.363 TP62.1@5.724,88.112 ; v2(5.724,82.922) 5.736,82.911 6.587,82.911 U14.3@6.598,82.9
NetC75_2: C75.2 DD1.6 | length 1.9
  Bottom Layer w0.5: C75.2@6.183,157.874 6.219,157.91 DD1.6@8.034,157.91
NetC76_2: C76.2 R78.2 R79.2 TP66.1 U7.2 | length 23.7
  Bottom Layer w0.5: R79.2@18.7,85.825 18.85,85.675 18.85,85.397 21.347,82.9 26.929,82.9 TP66.1@31.815,78.014 U7.2@31.815,74.8
  Bottom Layer w1: R79.2@18.7,85.825 18.723,85.848 C76.2@18.723,87.913 20.513,87.913 R78.2@20.55,87.95
NetC77_2: C77.2 R74.1 R75.1 R78.1 R80.2 TP67.1 | length 31.7
  Bottom Layer w0.5: R78.1@20.55,89.95 22.5,89.95 26.175,86.275 R75.1@26.175,84.275 ; R75.1@26.094,83.9 33.052,83.9 TP67.1@37.677,79.275
  Bottom Layer w1: R80.2@18.676,92.675 R80.2@18.725,92.626 ; R78.1@20.55,89.95 18.75,89.95 C77.2@18.725,89.975 R80.2@18.725,92.626 ; R74.1@23.225,92.6 R74.1@20.775,92.6 18.751,92.6 R80.2@18.725,92.626
NetC80_1: C80.1 DD1.1 DD1.2 J1.1 | length 9
  Bottom Layer w2: C80.1@9.1,166.175 15.884,166.175 J1.1@17.425,164.634
NetC81_1: C81.1 C83.2 C92.1 C94.2 J4.1 J26.1 R95.1 R96.1 R98.1 R99.1 VD11.1 VD13.1 VT5.3 VT6.3 VT7.2 VT8.2 | length 107.4
  Top Layer w2: J26.1@142.545,107.808 J26.1@142.545,112.888
  Bottom Layer w1.5: R99.1@128.279,127.036 132.001,127.036 VT5.3@135.334,130.369 ; VD13.1@148.377,75.78 148.402,75.755 148.402,74.166 C94.2@148.427,74.14 ; VD13.1@148.754,75.641 149.529,76.416 R96.1@155.678,76.416 R96.1@158.128,76.416 158.074,76.47 VD11.1@158.074,89.761 155.267,92.568 139.344,92.568 136.017,95.895 136.017,98.867 140.775,103.625 140.775,105.436 142.545,107.206 J26.1@142.545,107.808 J26.1@142.545,112.888 142.545,116.971 148.422,122.848 R98.1@148.422,127.061 152.026,127.061 VT6.3@155.334,130.369
NetC84_1: C84.1 C85.2 C122.1 C123.2 J5.1 J36.1 R109.1 R110.1 R135.1 R136.1 VD21.1 VD23.1 VT9.3 VT10.3 VT11.2 VT12.2 | length 107.9
  Top Layer w2: J36.1@242.888,108.35 J36.1@242.888,113.43
  Bottom Layer w1.5: R109.1@228.406,127.004 231.969,127.004 VT9.3@235.334,130.369 ; C123.2@248.127,74.135 248.102,74.16 248.102,75.61 VD23.1@248.076,75.635 248.347,75.635 249.086,76.374 C122.1@251.787,76.374 257.567,76.374 R136.1@257.682,76.489 257.808,76.615 VD21.1@257.808,89.864 254.622,93.05 238.608,93.05 235.382,96.276 235.382,99.07 240.852,104.541 R135.1@240.852,105.268 240.852,106.123 242.888,108.158 J36.1@242.888,108.35 J36.1@242.888,113.43 242.888,118.813 248.32,124.245 R110.1@248.32,127.004 251.969,127.004 VT10.3@255.334,130.369
NetC87_2: C87.2 D13.2 R120.2 R123.1 TP24.1 U8.14 | length 64.2
  Bottom Layer w0.3: U8.14@188.292,14.131 189.972,14.131 191.039,13.064 211.214,13.064 215.025,16.875 215.025,29.35 211.025,33.35 208.125,33.35 206.475,35 206,35 206,38.584 204.632,39.952 C87.2@203.372,39.952 ; R123.1@201.5,38.7 201.5,39.945 R120.2@201.507,39.952 C87.2@203.372,39.952 ; D13.2@203.707,38.4 D13.2@203.407,38.7 203.372,38.735 C87.2@203.372,39.952
NetC89_2: C89.2 D11.2 R121.2 R124.1 TP28.1 U8.15 | length 59.8
  Bottom Layer w0.3: U8.15@188.624,13.645 188.766,13.645 188.78,13.631 189.725,13.631 189.745,13.611 189.775,13.611 191.461,11.925 211.425,11.925 215.997,16.497 215.997,30.703 212.264,34.436 212.264,35 212.264,37.869 211.533,38.6 210.672,38.6 210.672,38.7 R124.1@210.322,39.05 ; D11.2@208.532,38.7 R121.2@208.532,40.027 C89.2@210.322,40.027 R124.1@210.322,39.05 ; R124.1@210.322,38.725 R124.1@210.322,39.05
NetC90_2: C90.2 D15.2 R122.2 R125.1 TP29.1 U8.16 | length 60.6
  Bottom Layer w0.3: U8.16@188.292,13.131 189.576,13.131 191.262,11.445 212.17,11.445 217.1,16.375 217.1,34.25 217.1,35.353 217.1,37.896 218.154,38.95 218.727,38.95 218.903,39.125 218.903,39.863 C90.2@218.992,39.952 ; D15.2@215.375,38.7 R125.1@215.375,39.952 ; R125.1@215.375,39.952 R122.2@217.202,39.952 C90.2@218.464,39.952
NetC97_2: C97.2 Q2.3 R104.2 R108.2 U21.5 | length 18.1
  Top Layer w0.5: U21.5@160.818,48.086 160.818,42.606 161.111,42.313 161.663,42.313 161.813,42.163 R108.2@161.813,41.938 C97.2@161.813,40.118 164.707,40.118 v2(166.76,42.17)
  Bottom Layer w0.5: v2(166.76,42.17) Q2.3@166.76,43.32 166.81,43.37 166.81,44.091 167.487,44.767 167.712,44.767 167.862,44.917 R104.2@167.862,45.142
NetC98_2: C98.2 R107.2 U21.6 | length 4.5
  Top Layer w0.5: R107.2@161.813,43.721 161.813,46.525 162.088,46.8 U21.6@162.088,48.086
NetC126_2: C126.2 Q3.3 R132.2 R147.2 U32.5 | length 17.7
  Top Layer w0.5: U32.5@261.812,47.979 261.807,47.974 261.807,42.338 262.1,42.045 262.657,42.045 R147.2@262.807,41.895 ; R147.2@262.807,41.67 262.807,39.9 C126.2@262.812,39.895 265.186,39.894 v2(267.723,42.432)
  Bottom Layer w0.5: v2(267.723,42.432) 267.749,42.458 267.749,43.327 Q3.3@267.775,43.353
  Bottom Layer w0.6: Q3.3@267.775,43.353 267.775,43.966 268.659,44.85 268.659,45.075 R132.2@268.759,45.175
NetC127_2: C127.2 R146.2 U32.6 | length 4.7
  Top Layer w0.5: R146.2@262.807,43.45 262.777,43.479 262.777,46.277 263.035,46.535 263.035,47.932 U32.6@263.082,47.979
NetD1_1: D1.1 R7.1 | length 2.5
  Top Layer w0.8: D1.1@104.43,54.366 R7.1@106.88,54.366
NetD2_1: D2.1 R8.1 | length 2.5
  Top Layer w0.8: D2.1@104.43,57.366 R8.1@106.88,57.366
NetD3_1: D3.1 R9.1 | length 2.3
  Top Layer w0.8: D3.1@104.555,60.423 104.612,60.366 R9.1@106.88,60.366
NetD4_1: D4.1 R10.1 | length 2.5
  Top Layer w0.8: D4.1@104.455,40.216 R10.1@106.905,40.216
NetD5_1: D5.1 R11.1 | length 2.5
  Top Layer w0.8: D5.1@104.455,43.216 R11.1@106.905,43.216
NetD6_1: D6.1 R12.1 | length 2.5
  Top Layer w0.8: D6.1@104.455,46.216 R12.1@106.905,46.216
NetD7_1: D7.1 R46.1 | length 2.5
  Top Layer w0.6: D7.1@104.43,63.245 R46.1@106.929,63.245
NetD8_1: D8.1 R39.1 | length 2.9
  Top Layer w1: v3(276.541,38.261) D8.1@276.541,40.368
  Bottom Layer w1: R39.1@276.52,39.078 276.541,39.058 v3(276.541,38.261)
NetD9_1: D9.1 R47.1 | length 2.5
  Top Layer w0.6: D9.1@104.43,66.255 R47.1@106.929,66.255
NetD10_1: D10.1 L1.1 U18.2 | length 22.9
  Top Layer w2: v8(26.343,34.4) L1.1@32.25,34.4
  Bottom Layer w1: U18.2@16.335,26.742 24.953,26.742 D10.1@25.004,26.691
  Bottom Layer w2: D10.1@25.004,26.691 25.004,33.061 v8(26.343,34.4)
NetD12_1: D12.1 R60.1 U13.15 | length 31.9
  Top Layer w0.7: v4(50.196,80.061) 53.873,76.384 53.873,72.052 58.525,67.4 58.525,62.375 56.711,60.561 U13.15@56.711,58.226
  Bottom Layer w0.5: R60.1@51.421,79.986 R60.1@51.436,79.971
  Bottom Layer w1: D12.1@46.406,81.261 46.406,80.861 47.164,80.103 48.854,80.103 R60.1@48.971,79.986 49.046,80.061 51.346,80.061 R60.1@51.436,79.971
NetD12_2: D12.2 J14.1 R60.2 R61.2 R83.1 R85.1 VD2.2 | length 86.6
  Top Layer w2: J14.1@37.562,107.464 J14.1@37.562,112.544
  Bottom Layer w1.5: R83.1@24.891,125.004 37.449,125.004 ; R61.2@39.075,103.998 38.152,103.075 36.9,103.075 34.425,100.6 34.425,94.95 39.244,90.131 VD2.2@51.436,90.131 51.436,86.551 R60.2@51.421,86.536 R60.2@48.971,86.536 48.854,86.419 47.164,86.419 46.406,85.661 D12.2@46.406,85.261 ; R61.2@39.099,103.998 39.099,104.822 37.562,106.358 J14.1@37.562,107.464 J14.1@37.562,112.544 37.562,124.891 37.449,125.004 ; R85.1@44.666,125.004 37.449,125.004
NetD14_1: D14.1 R77.1 U13.10 | length 30.1
  Top Layer w0.7: U13.10@63.061,58.226 63.061,60.846 60.996,62.911 60.996,67.011 64.686,70.701 v4(64.686,80.161)
  Bottom Layer w0.5: R77.1@65.851,80.17 R77.1@65.86,80.161
  Bottom Layer w1: D14.1@60.816,81.445 60.816,81.045 61.166,80.695 61.691,80.17 R77.1@63.401,80.17 63.41,80.161 R77.1@65.86,80.161
NetD14_2: D14.2 J19.1 R77.2 R81.2 R89.1 R90.1 VD6.2 | length 86.9
  Top Layer w2: J19.1@77.277,107.512 J19.1@77.277,112.592
  Bottom Layer w1.5: D14.2@60.816,85.445 61.166,85.795 61.166,86.315 61.752,86.901 63.22,86.901 R77.2@63.401,86.72 R77.2@65.851,86.72 65.916,86.785 VD6.2@65.916,90.131 68.353,92.568 81.077,92.568 83.736,95.227 83.736,99.339 79.299,103.776 R81.2@79.299,104.099 ; R89.1@64.666,125.004 R90.1@84.666,125.004 ; 77.277,124.954 J19.1@77.277,112.592 J19.1@77.277,107.512 77.277,107.294 79.299,105.272 ; R81.2@79.299,104.276 79.299,105.45
NetD17_1: D17.1 R92.1 U21.15 | length 32.4
  Top Layer w0.7: v4(151.973,79.881) 158.503,73.351 160.075,71.779 160.075,62.593 157.008,59.526 U21.15@157.008,57.836
  Bottom Layer w1: D17.1@148.143,81.081 148.143,80.681 149.018,79.806 R92.1@150.748,79.806 150.823,79.881 v4(151.973,79.881) ; v4@152.048,79.806 R92.1@153.198,79.806
NetD17_2: D17.2 J24.1 R92.2 R94.1 R95.2 R97.1 VD11.2 | length 88.5
  Top Layer w2: J24.1@137.109,107.808 J24.1@137.109,112.888
  Bottom Layer w1.5: R94.1@124.638,125.004 137.109,125.004 ; R97.1@144.666,125.004 137.109,125.004 ; D17.2@148.143,85.081 148.143,85.481 149.109,86.446 150.657,86.446 R92.2@150.748,86.356 R92.2@153.198,86.356 153.193,86.361 VD11.2@153.193,89.761 139.189,89.761 134.025,94.925 134.025,99.482 138.675,104.132 138.675,104.157 R95.2@138.775,104.257 138.775,105.249 137.109,106.915 137.109,125.004
NetD19_1: D19.1 R115.1 U21.10 | length 29.9
  Top Layer w0.7: U21.10@163.358,57.836 163.358,60.167 162.175,61.35 162.175,66.48 165.853,70.158 v4(165.853,79.881)
  Bottom Layer w1: D19.1@161.953,81.081 161.953,80.681 162.828,79.806 R115.1@164.628,79.806 164.703,79.881 v4(165.853,79.881) ; v4@165.928,79.806 R115.1@167.078,79.806
NetD19_2: D19.2 J29.1 R100.1 R101.1 R115.2 R118.2 VD15.2 | length 85.3
  Top Layer w2: J29.1@177.278,107.681 J29.1@177.278,112.761
  Bottom Layer w1.5: D19.2@161.953,85.081 161.953,85.481 162.655,86.182 164.455,86.182 R115.2@164.628,86.356 R115.2@167.078,86.356 167.153,86.431 VD15.2@167.153,89.771 169.899,92.517 180.34,92.517 183.575,95.752 183.575,99.175 179.179,103.571 179.179,105.319 177.278,107.22 J29.1@177.278,107.681 177.106,107.852 177.106,125.004 ; R100.1@164.666,125.004 177.106,125.004 ; R101.1@184.709,125.004 177.106,125.004
NetD21_1: D21.1 R131.1 U32.15 | length 32.4
  Top Layer w0.7: v4(254.337,79.674) 254.337,72.404 260.207,66.534 260.207,62.454 258.002,60.249 U32.15@258.002,57.729
  Bottom Layer w0.5: R131.1@252.927,79.684 R131.1@252.937,79.674
  Bottom Layer w1: D21.1@247.952,80.959 247.952,80.559 248.67,79.842 250.32,79.842 R131.1@250.477,79.684 R131.1@252.927,79.684 ; R131.1@252.937,79.674 v4(254.337,79.674)
NetD21_2: D21.2 J34.1 R105.1 R106.1 R131.2 R135.2 VD21.2 | length 88.8
  Top Layer w2: J34.1@236.888,108.35 J34.1@236.888,113.43
  Bottom Layer w1.5: R105.1@224.663,125.004 R106.1@244.666,125.004 ; 236.888,125.004 J34.1@236.888,113.43 J34.1@236.888,108.35 236.888,108.016 238.852,106.052 R135.2@238.852,105.268 238.852,105.03 233.477,99.654 233.477,95.514 239.127,89.864 VD21.2@252.927,89.864 R131.2@252.927,86.234 R131.2@250.477,86.234 250.32,86.077 248.67,86.077 247.952,85.359 D21.2@247.952,84.959
NetD24_1: D24.1 R149.1 U32.10 | length 33
  Top Layer w0.7: U32.10@264.352,57.729 264.352,59.93 262.35,61.932 262.35,67.011 268.748,73.409 v4(268.748,79.69)
  Bottom Layer w0.5: R149.1@267.182,79.69 R149.1@267.293,79.579
  Bottom Layer w1: D24.1@262.107,80.965 262.107,80.565 263.093,79.579 264.621,79.579 R149.1@264.732,79.69 R149.1@267.182,79.69 ; R149.1@267.293,79.579 267.404,79.69 v4(268.748,79.69)
NetD24_2: D24.2 J38.1 R112.1 R114.1 R149.2 R152.2 VD25.2 | length 85.2
  Top Layer w2: J38.1@277.38,108.426 J38.1@277.38,113.506
  Bottom Layer w1.5: D24.2@262.107,84.965 262.457,85.315 262.457,85.939 263.043,86.524 264.507,86.524 264.732,86.299 R149.2@264.732,86.24 R149.2@267.182,86.24 267.182,89.889 VD25.2@267.167,89.904 270.161,92.898 280.619,92.898 283.125,95.404 283.125,100.273 279.34,104.058 R152.2@279.34,105.243 279.34,106.124 277.38,108.083 J38.1@277.38,108.426 J38.1@277.38,113.506 277.38,124.931 277.453,125.004 ; R112.1@264.666,125.004 277.453,125.004 ; R114.1@284.633,125.004 277.453,125.004
NetDD1_7: DD1.7 R69.1 | length 2
  Bottom Layer w0.5: R69.1@6.116,159.392 6.116,159.33 6.266,159.18 DD1.7@8.034,159.18